# Altium PCB V3.2_Board.PcbDoc (part 1 of 9)
Units mil, origin at the board's own origin, x right, y up, seen from the top; angles counter-clockwise.
Board outline 7795.28 x 4881.89 mil, 2 copper layers (Top Layer, Bottom Layer), stack 57 mil thick; 419 components, 273 nets, 1244 pads, 414 vias.
Unrouted connection lines stored in the file: 3.
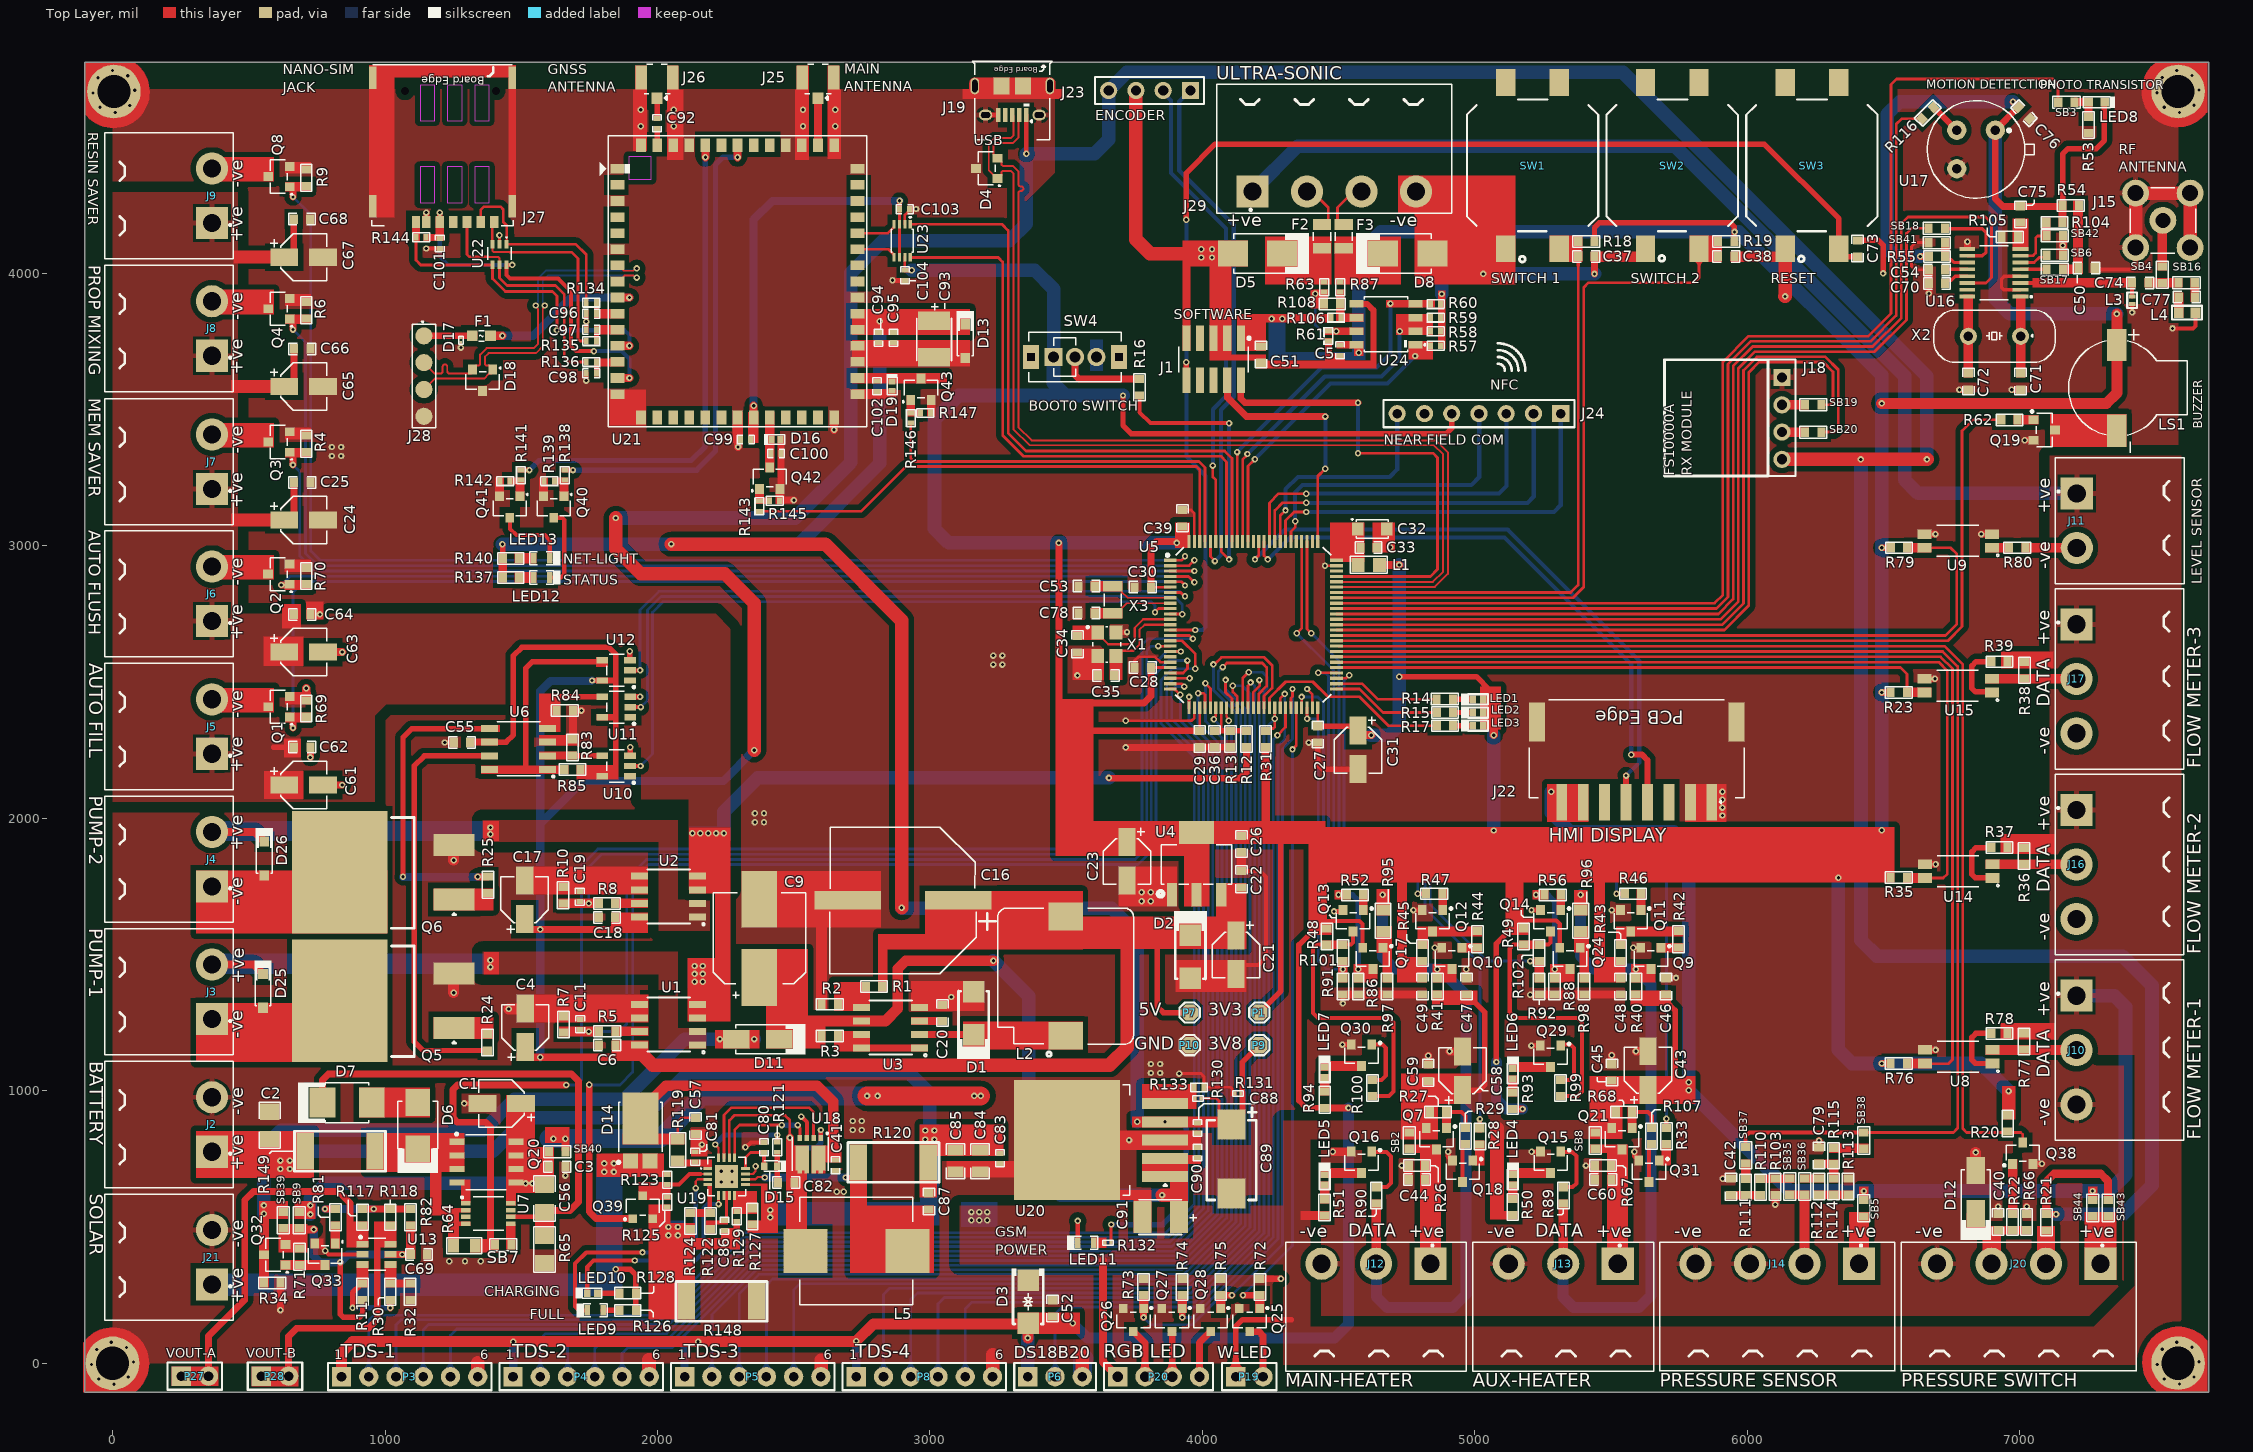
[diagram p0: Top Layer view]
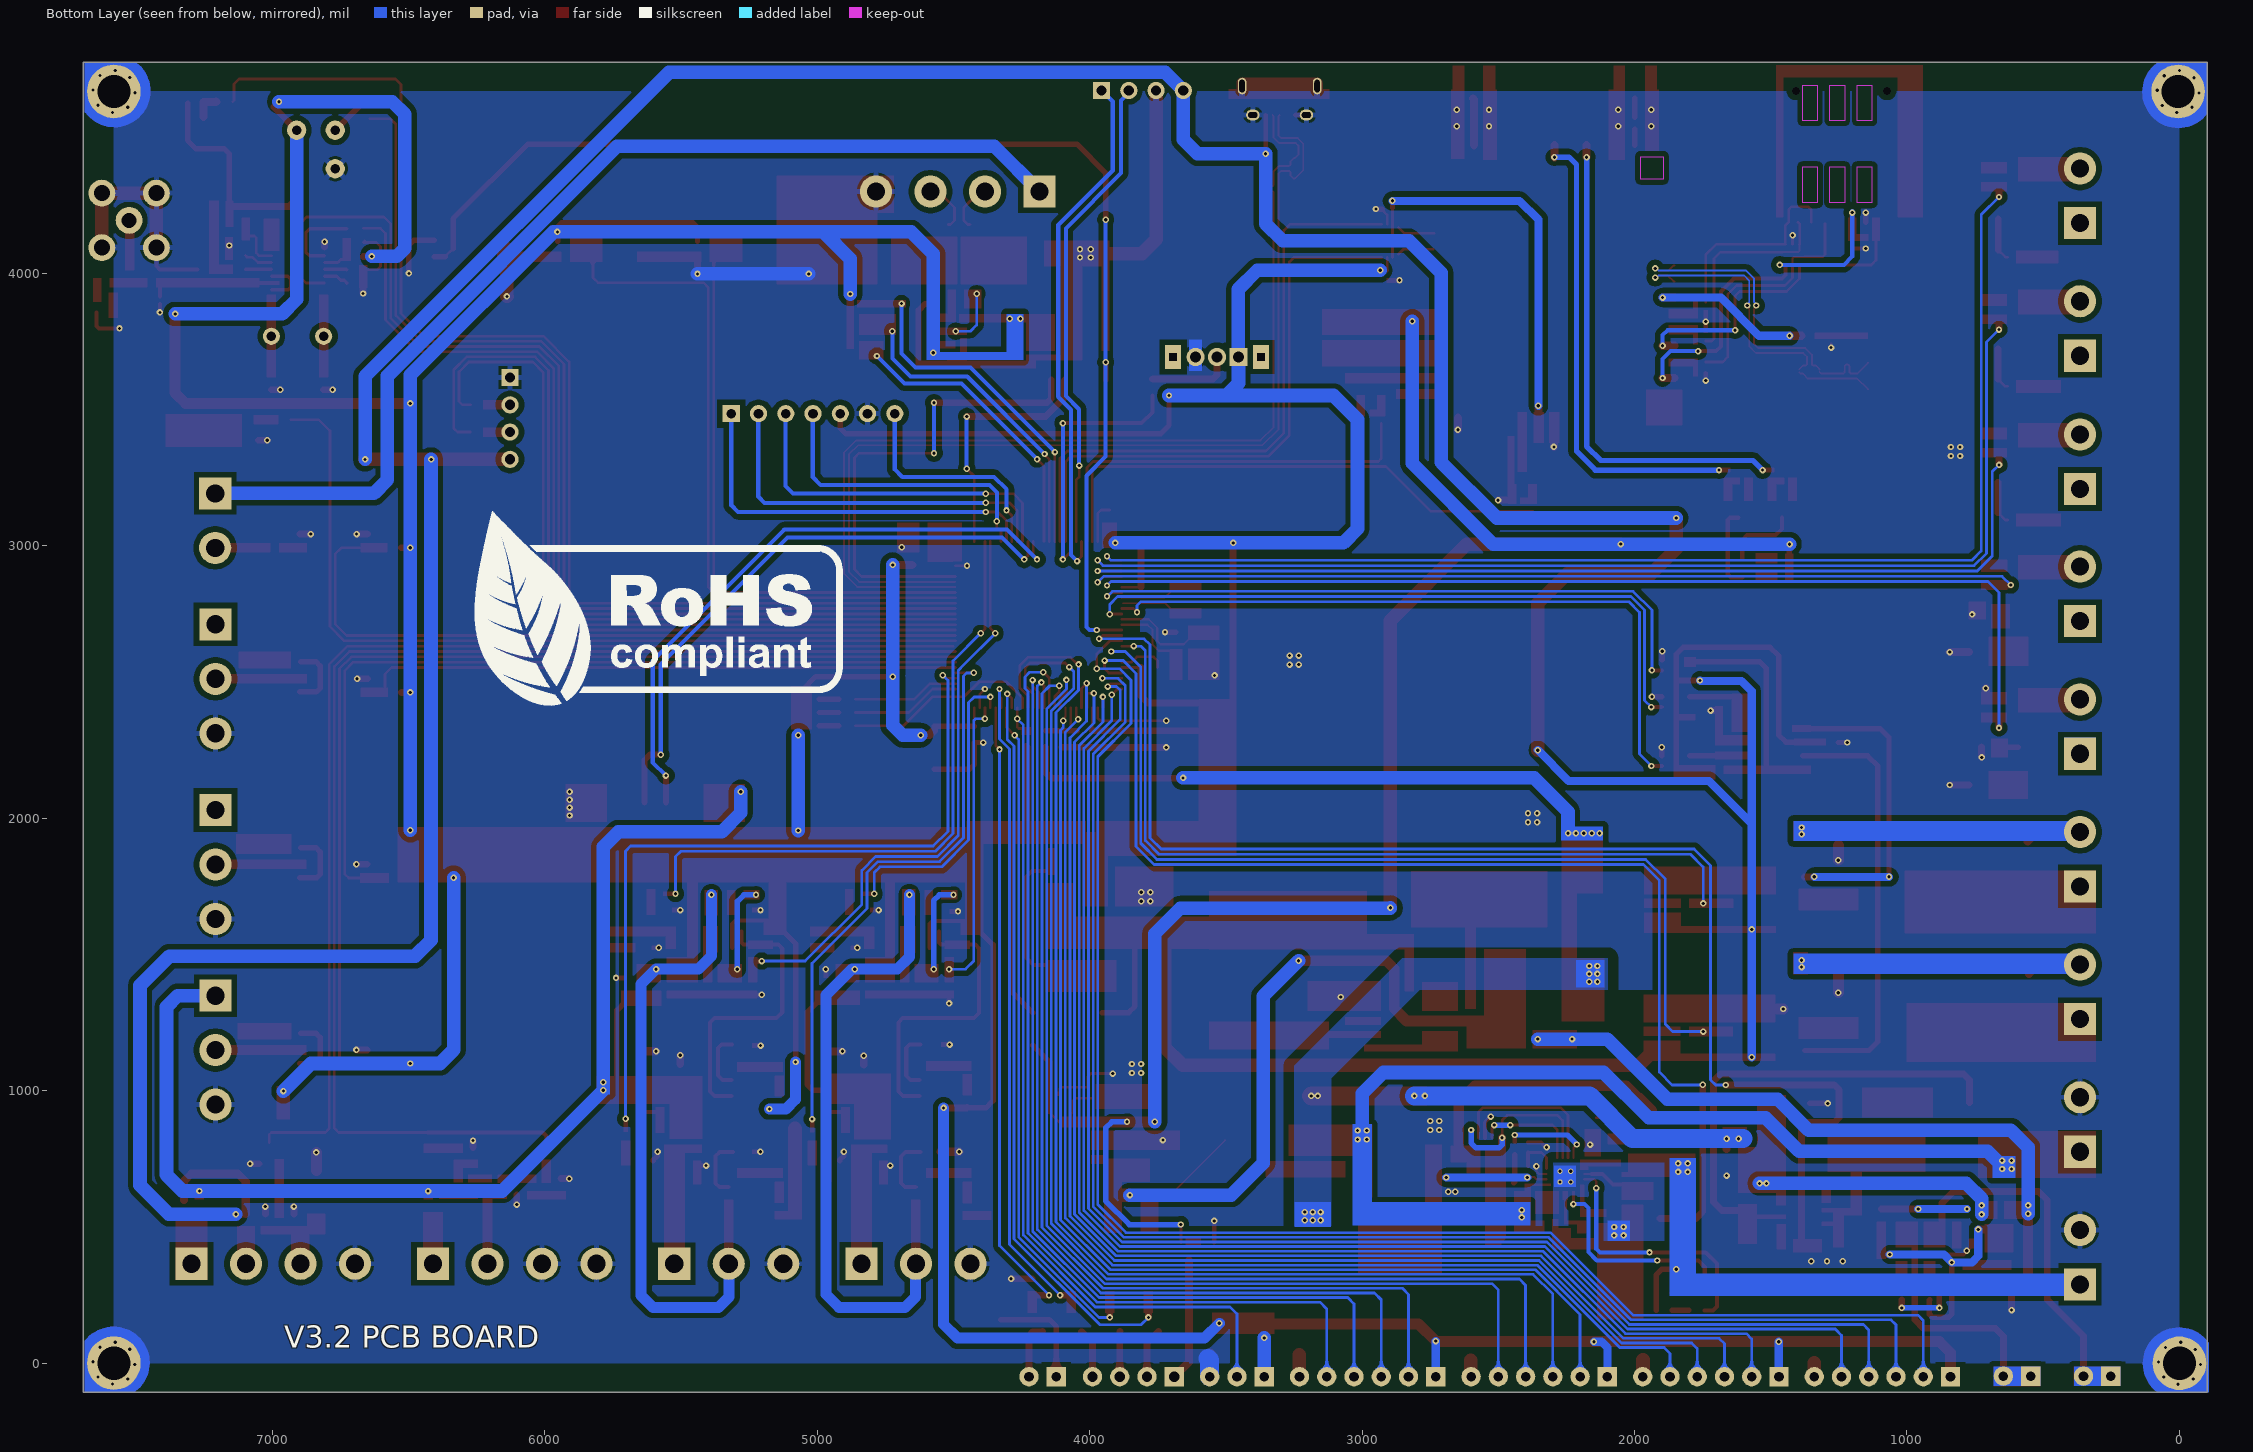
[diagram p1: Bottom Layer view, seen from below]
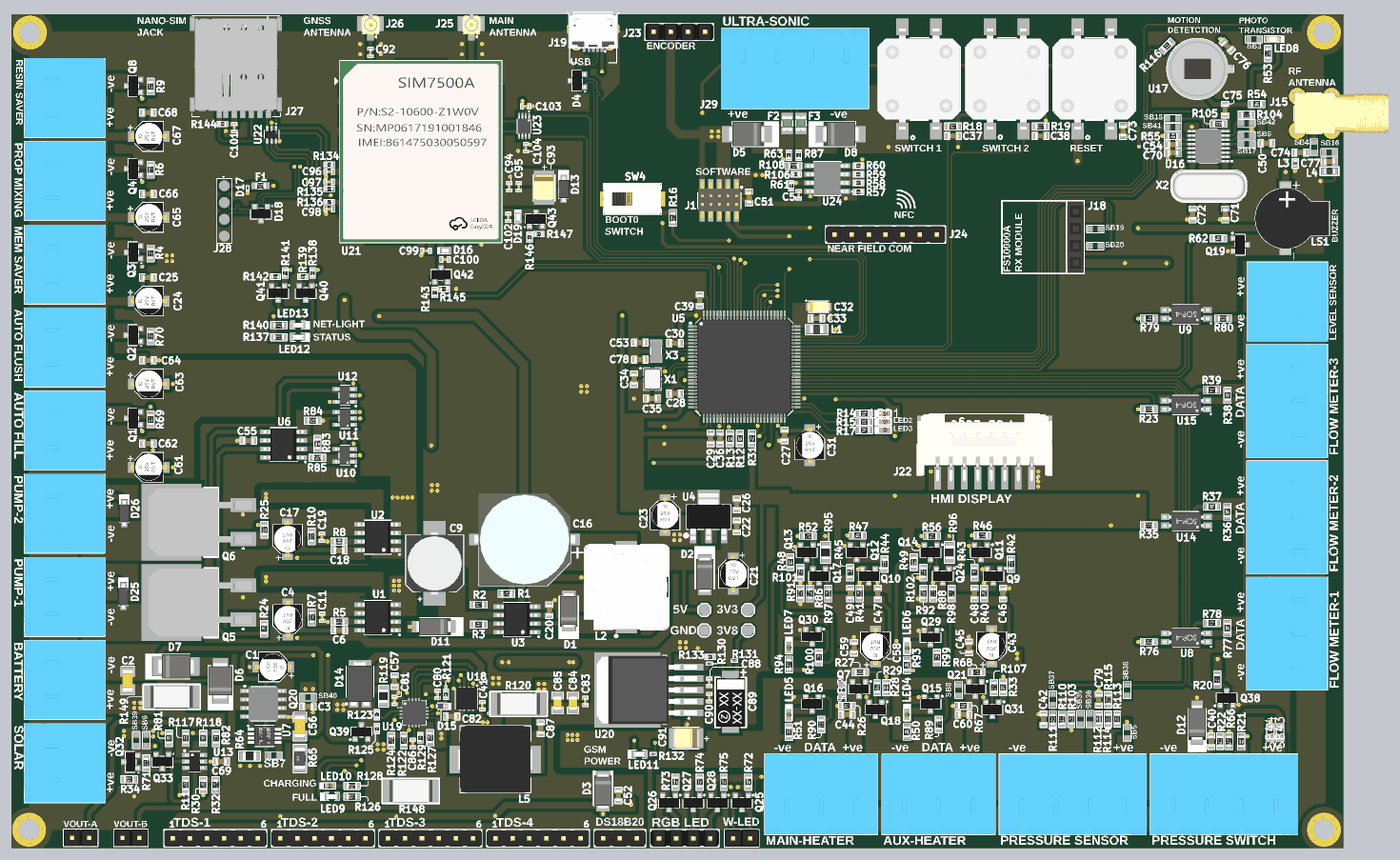
[diagram p6: 3D render of the assembled board from above, using the file's embedded part models]

## Layer stack, top to bottom
Top Solder: solder mask 3, Solder Resist, Dk 3.5
Top Layer: signal copper 10
Dielectric 1: dielectric 37, FR-4, Dk 4.8
Bottom Layer: signal copper 10
Bottom Solder: solder mask 3, Solder Resist, Dk 3.5

## Board outline
-102.2,-107.47 -102.2,4774.42 7693.08,4774.42 7693.08,-107.23 7693.08,-107.47

## Design rules (kind name [scope] priority, off if disabled: settings)
Clearance [All] p1: gap=10 ignorepadtopadclearanceinfootprint=FALSE except(7: Arc-SMDPad Track-Track Track-SMDPad SMDPad-SMDPad SMDPad-Via SMDPad-Fill; 20: Arc-Poly Track-Poly SMDPad-Poly THPad-Poly Via-Poly Fill-Poly Poly-Region; 40: Poly-Poly)
ComponentClearance [All] p1: gap=0 collisioncheckmode=3 verticalgap=0 showdistances=FALSE
DiffPairsRouting RS485 [InDifferentialPairClass('RS485_LINES')] p1: maxlimit=24 minlimit=24 mostfreqgap=24 toplayer_minwidth=10 toplayer_maxwidth=10 toplayer_prefwidth=10 bottomlayer_minwidth=10 bottomlayer_maxwidth=10 bottomlayer_prefwidth=10 impedanceprofiledriven=TRUE impedanceprofileid={96F7C619-5FC5-426D-8E7C-580E3D6EA915} impedanceprofilevalue=120.000000 maxuncoupledlength=500
DiffPairsRouting [All] p2: maxlimit=11 minlimit=11 mostfreqgap=11 toplayer_minwidth=7 toplayer_maxwidth=7 toplayer_prefwidth=7 bottomlayer_minwidth=7 bottomlayer_maxwidth=7 bottomlayer_prefwidth=7 impedanceprofiledriven=TRUE impedanceprofileid={F2DA4722-311A-4C31-A35F-DFB7A417A014} impedanceprofilevalue=90.000000 maxuncoupledlength=500
HoleSize [All] p1: absolutevalues=TRUE maxlimit=1000 minlimit=1 maxpercent=80.000 minpercent=20.000
HoleToHoleClearance [All] p1: gap=0 allowstackedmicrovias=TRUE
MatchedLengths "Schematic Matched Net Lengths" [InNetClass('RS485')] p1: tolerance=20 checknetsindiffpair=TRUE checkdiffpairvsdiffpair=FALSE checkxsignals=FALSE checkothers=FALSE
MatchedLengths "Schematic Matched Net Lengths_2" [InNetClass('USB_D')] p2: tolerance=50 checknetsindiffpair=TRUE checkdiffpairvsdiffpair=FALSE checkxsignals=FALSE checkothers=FALSE
MatchedLengths "Schematic Matched Net Lengths_1" [InNetClass('GSM_USB')] p3: tolerance=20 checknetsindiffpair=TRUE checkdiffpairvsdiffpair=FALSE checkxsignals=FALSE checkothers=FALSE
MaxMinImpedance "Schematic Impedance Constraint" [InNetClass('RS485')] p1: minimum=115.0 maximum=120.0
MaxMinImpedance "Schematic Impedance Constraint_2" [InNetClass('USB_D')] p2: minimum=85.00 maximum=90.00
MaxMinImpedance "Schematic Impedance Constraint_1" [InNetClass('GSM_USB')] p3: minimum=88.00 maximum=90.00
MinimumSolderMaskSliver [All] p1: minsoldermaskwidth=0
PolygonConnect [All] p1: thpad.connectstyle=Relief thpad.reliefconductorwidth=20 thpad.reliefentries=4 thpad.polygonreliefangle="90 Angle" thpad.airgapwidth=10 smdpad.connectstyle=Direct smdpad.reliefconductorwidth=20 smdpad.reliefentries=4 smdpad.polygonreliefangle="90 Angle" smdpad.airgapwidth=10 via.connectstyle=Direct via.reliefconductorwidth=10 via.reliefentries=4 via.polygonreliefangle="90 Angle" via.airgapwidth=10
RoutingVias [All] p1: holewidth=11.81 width=23.62 viastyle="Through Hole" minholewidth=11.81 minwidth=23.62 maxholewidth=31.5 maxwidth=62.99
SilkToSilkClearance [All] p1: silktosilkclearance=0
SilkToSolderMaskClearance [IsPad] p1: minsilkscreentomaskgap=0 clearancetoexposedcopper=TRUE
SolderMaskExpansion SolderMaskExpansion_1 [IsVia] p1: expansion=0 istentingtop=FALSE soldermaskfromhole=TRUE
SolderMaskExpansion [Not IsVia] p2: expansion=4 istentingtop=FALSE
Width [All] p1: maxlimit=70 minlimit=7 preferedwidth=10 minimp=50.000000 maximp=50.000000 favimp=50.000000
23 further rules are at their usual default settings.

## Classes and differential pairs
differential pair class RS485_LINES: RS485
net class RS485: RS485_N RS485_P
component class U_Ultra_Sonic_Section: C5 D5 D8 F2 F3 J29 R57 R58 R59 R60 R61 R63 R87 R106 R108 U24
component class U_HMI_Encoder_NFC_Sheet: J22 J23 J24
differential pair class GSM_USB_Lines: GSM_USB_D
net class GSM_USB: GSM_USB_D_N GSM_USB_D_P
component class U_Solar_Charge_Controller: C41 C57 C80 C81 C82 C83 C84 C85 C86 C87 D14 D15 J21 L5 LED9 LED10 Q39 R119 R120 R121 R122 R123 R124 R125 R126 R127 R128 R129 R148 U18 U19
component class U_GSM_Sheet: C92 C93 C94 C95 C96 C97 C98 C99 C100 C101 C102 C103 C104 D13 D16 D17 D18 D19 F1 J25 J26 J27 J28 LED12 LED13 Q40 Q41 Q42 Q43 R134 R135 R136 R137 R138 R139 R140 R141 R142 R143 R144 R145 R146 R147 U21 U22 U23
differential pair class USB_D_Lines: USB_D
net class USB_D: USB_D_N USB_D_P
component class U_Voltage_Monitoring_Section: C69 P27 P28 Q32 Q33 R11 R30 R32 R34 R71 R81 R82 R117 R118 S SB9 SB39 U13
component class U_Temperature_Sense_Section: C52 D3 P3 P4 P5 P6 P8
component class U_Valve_Section: C24 C25 C61 C62 C63 C64 C65 C66 C67 C68 J5 J6 J7 J8 J9 Q1 Q2 Q3 Q4 Q8 R4 R6 R9 R69 R70 S
component class U_Sensor_Section: J10 J11 J16 J17 R23 R35 R36 R37 R38 R39 R76 R77 R78 R79 R80 U8 U9 U14 U15
component class U_LED_Section: P19 P20 Q25 Q26 Q27 Q28 R72 R73 R74 R75 S
component class U_Heater_Section: C43 C44 C45 C46 C47 C48 C49 C58 C59 C60 J12 J13 LED4 LED5 LED6 LED7 Q7 Q9 Q10 Q11 Q12 Q13 Q14 Q15 Q16 Q17 Q18 Q21 Q24 Q29 Q30 Q31 R26 R27 R28 R29 R33 R40 R41 R42 R43 R44 R45 R46 R47 R48 R49 R50 R51 R52 R56 R67 R68 R86 R88 R89 R90 R91 R92 R93 R94 R95 R96 R97 R98 R99 R100 R101 R102 R107 S SB2 SB8
component class U_Switch_Sheet: C37 C38 R18 R19 SW1 SW2
component class U_Regulator_Section: C9 C16 C20 C21 C22 C23 C26 C88 C89 C90 C91 D1 D2 D11 L2 LED11 P1 P7 P9 P10 R1 R2 R3 R130 R131 R132 R133 U3 U4 U20
component class U_Receiver_Section: C50 C54 C70 C71 C72 C74 C75 C77 J15 J18 L3 L4 R54 R55 R104 R105 S SB4 SB6 SB16 SB17 SB18 SB19 SB20 SB41 SB42 U16 X2
component class U_Gate_Driver_Section: C55 D25 D26 J3 J4 Q5 Q6 R24 R25 R83 R84 R85 U6 U10 U11 U12
component class U_Current_Sense_Section: C4 C6 C11 C17 C18 C19 R5 R7 R8 R10 U1 U2
component class U_Controller_Section: C27 C28 C29 C30 C31 C32 C33 C34 C35 C36 C53 C73 C78 L1 LED1 LED2 LED3 R12 R13 R14 R15 R16 R17 R31 S SW3 SW4 U5 X1 X3
component class U_Connector_Section: C39 C40 C42 C51 C76 C79 D4 D12 J1 J14 J19 J20 LED8 LS1 Q19 Q38 R20 R21 R22 R53 R62 R66 R103 R110 R111 R112 R113 R114 R115 R116 S SB3 SB5 SB35 SB36 SB37 SB38 SB43 SB44 U17
component class "U_Reverse Protection_Section": C1 C2 C3 C56 D6 D7 J2 Q20 R64 R65 R149 SB7 SB40 U7
differential pair RS485: +RS485_P -RS485_N
differential pair GSM_USB_D: +GSM_USB_D_P -GSM_USB_D_N
differential pair USB_D: +USB_D_P -USB_D_N

## Components (designator, comment, footprint, x,y, rotation, side; value= is the part's Value field where it differs from the comment)
C1 "10uF" RVT1E100M0405. 1428.24,953.36 r180 top locked
C2 "0.1uF" Cap-1206 577,873 r270 top locked
C3 "1uF" Cap0603 1632,721 r0 top
C4 "10uF" RVT1E100M0405. 1514.64,1231.47 r90 top
C5 "0.1uf" Cap-0402 4505.16,3717.52 r90 top
C6 "0.1uF" Cap0603 1815.64,1167.25 r180 top
C9 "100uF" UWX1E101MCL1GB 2374.02,1559.16 r90 top locked
C11 "1nF" Cap-0402 1716.42,1243.47 r90 top
C16 "470uF" VT1H471MI135000CE0 2901.11,1699.36 r180 top locked
C17 "10uF" RVT1E100M0405. 1512.68,1700.47 r90 top
C18 "0.1uF" Cap0603 1814.64,1636.25 r180 top
C19 "1nF" Cap-0402 1714.42,1712.47 r90 top
C20 "470pF" Cap0603 3046,1285 r270 top locked
C21 "10uF" RVT1E100M0405. 4123.35,1499.17 r270 top
C22 "0.1uF" Cap0603 4143.11,1776.36 r90 top
C23 "10uF" RVT1E100M0405. 3723.25,1842.39 r270 top locked
C24 "10uF" RVT1E100M0405. 701,3095.04 r0 top locked
C25 "0.1uF" Cap0603 696,3233 r0 top locked
C26 "0.1uF" Cap0603 4143.11,1905.39 r270 top
C27 "0.1uF" Cap0603 4423.2,2307.85 r270 top
C28 "0.1uF" Cap0603 3781,2553.04 r180 top
C29 "0.1uF" Cap0603 3990.13,2290.85 r270 top
C30 "0.1uF" Cap0603 3781,2848.32 r180 top
C31 "10uF" RVT1E100M0405. 4571,2251 r270 top
C32 "1uF" "CAP-CASE A" 4623,3062 r0 top
C33 "0.1uF" Cap0603 4610,2993.56 r0 top
C34 "30pF" Cap0603 3541.11,2638.36 r90 top
C35 "30pF" Cap0603 3646.11,2524.36 r0 top
C36 "0.1uF" Cap0603 4045.11,2290.85 r270 top
C37 "0.1uF" Cap0603 5409.05,4062.36 r180 top locked
C38 "0.1uF" Cap0603 5922.41,4062.36 r180 top locked
C39 "0.1uF" Cap0603 3926.31,3101 r90 top
C40 "1uF" Cap0603 6920.13,518 r90 top
C41 "1uF" Cap0402 2653.6,726.22 r90 top
C42 "1uF" Cap-0603 5940,647.36 r90 top locked
C43 "10uF" RVT1E100M0405. 5635.5,1074 r90 top locked
C44 "0.1uF" Cap0603 4787.3,673.58 r0 top
C45 "1uF" Cap0603 5503,1067 r90 top locked
C46 "0.1uF" Cap0603 5701.4,1383 r90 top locked
C47 "0.1uF" Cap0603 4969.25,1383 r90 top locked
C48 "0.1uF" Cap0603 5535,1383 r270 top locked
C49 "0.1uF" Cap0603 4807,1383 r270 top locked
C50 "0.1uF" Cap-0603 7245,4019.56 r0 top
C51 "0.1uF" Cap0603 4215.05,3701.89 r270 top
C52 "0.1uF" Cap0603 3450,201 r90 top locked
C53 "20pF" Cap0603 3575,2851.85 r0 top
C54 "0.1uF" Cap-0603 6696,4012.67 r180 top locked
C55 "0.1uF" Cap0603 1283,2278 r180 top
C56 "0.047uF" Cap-1206 1585.11,604.36 r90 top locked
C57 "10uF" Cap0603 2139.88,870.64 r90 top
C58 "10uF" RVT1E100M0405. 4955,1073 r90 top locked
C59 "1uF" Cap0603 4828.77,1066 r90 top locked
C60 "0.1uF" Cap0603 5471,673.58 r0 top locked
C61 "10uF" RVT1E100M0405. 701,2122.04 r0 top locked
C62 "0.1uF" Cap0603 696,2261 r0 top locked
C63 "10uF" RVT1E100M0405. 701,2610 r0 top locked
C64 "0.1uF" Cap0603 696,2748 r0 top locked
C65 "10uF" RVT1E100M0405. 701,3585.04 r0 top locked
C66 "0.1uF" Cap0603 696,3722.36 r0 top locked
C67 "10uF" RVT1E100M0405. 701,4059.15 r0 top locked
C68 "0.1uF" Cap0603 695,4199 r0 top locked
C69 "0.1uF" Cap0603 1124.27,399.43 r0 top locked
C70 "0.47uF" Cap0603 6696,3963 r180 top locked
C71 "20pF" Cap-0603 7003.06,3603 r90 top
C72 "20pF" Cap-0603 6811.06,3603 r90 top locked
C73 "0.1uF" Cap0603 6405,4091 r270 top locked
C74 "1.2pF" Cap0603 7442,3965 r0 top locked
C75 "2.2uF" Cap0603 7002,4216 r90 top
C76 "0.1uF" Cap0603 7015.31,4588.34 r315 top locked
C77 "1.5pF" Cap0603 7613,3912.65 r0 top locked
C78 "20pF" Cap0603 3575,2752.85 r0 top
C79 "1uF" Cap-0603 6263,762 r270 top locked
C80 "1uF" Cap0402 2391,792 r90 top locked
C81 "1uF" Cap0402 2138.88,757.64 r270 top
C82 "0.1uF" Cap0603 2472.88,662.64 r0 top locked
C83 "1uF" Cap0402 3256.88,751.64 r90 top locked
C84 "22uF" Cap-0805 3184.38,741.64 r90 top locked
C85 "22uF" Cap-0805 3093.88,741.64 r90 top locked
C86 "1uF" Cap0402 2245.76,505.14 r90 top locked
C87 "0.1uF" Cap0603 2996,594 r90 top locked
C88 "0.1uf" Cap-0402 3981.86,863.37 r90 top
C89 "330uF" Case-E 4106.86,876.12 r270 top locked
C90 "0.1uf" Cap-0402 3981.86,773.12 r270 top
C91 "100uF" Case-B 3846.86,536.12 r180 top locked
C92 "33pF" Cap-0402 1998.65,4550.36 r90 top
C93 "220uF" Case-B 3015,3759 r270 top
C94 "0.1uf" Cap-0402 2811.11,3764.09 r90 top
C95 "1uF" Cap-0402 2866.11,3764.09 r90 top
C96 "22PF" Cap-0402 1757.11,3852.02 r0 top value=22pF
C97 "22PF" Cap-0402 1757.11,3792.97 r0 top value=22pF
C98 "22PF" Cap-0402 1757.11,3633.52 r0 top value=22pF
C99 "0.1uf" Cap-0402 2323.61,3390.36 r180 top
C100 "0.1uf" Cap-0402 2435.11,3338.36 r180 top
C101 "0.1uf" Cap-0402 1201.06,4109.58 r270 top
C102 "0.1uf" Cap-0402 2806.11,3585.36 r90 top
C103 "0.1uf" Cap-0402 2906.95,4234.86 r0 top
C104 "0.1uf" Cap-0402 2907.95,3992.85 r270 top
D1 "SS24A" SMA#1 3160,1284 r90 top locked
D2 "1SMA5930BT3G" SMA#1 3956,1492 r270 top
D3 "SMAJ5.0CA" SMAJ5.0CA 3360.11,225.36 r270 top locked
D4 "ESD5302F-3/TR" Sot-23 3209.02,4385.2 r90 top
D5 "SMBJ26CA" SMB_ 4202,4072.52 r0 top
D6 "SMBJ70A/TR13" SMB 1120,872 r90 top locked
D7 "SS510B" SS510B 861,956 r0 top locked
D8 "SMBJ26CA" SMB_ 4753.05,4072.52 r180 top
D11 "SS32 /SMA(DO-214AC)" SMA#2 2368.11,1189.36 r180 top
D12 "SMAJ5.0CA" SMA#2 6838,628 r90 top
D13 "MMSZ5231BT1G" SOD-123 3129.67,3751.09 r90 top
D14 "PDS1040-13" "PowerDI™ 5" 1937.1,820.02 r0 top locked
D15 "ZLLS350TA" SOD-523 2415.88,723.32 r0 top locked value=3.5pF
D16 "ESD5651N-2/TR" DFN1006-2L_ 2435.11,3390.36 r0 top
D17 "PESD5V0H1BSFYL" DSN0603-2 1278.73,3754.85 r90 top
D18 "ESD5302F-3/TR" Sot-23 1358,3607 r180 top
D19 "ESD5651N-2/TR" DFN1006-2L_ 2861.11,3585.81 r270 top
D25 "1N4148W-7-F" SOD-123 552.11,1366.36 r90 top locked value=2pF
D26 "1N4148W-7-F" SOD-123 557.11,1852.36 r90 top locked value=2pF
F1 "SMD0603-050" Fuse-0603 1353.73,3770.58 r180 top
F2 "SMD0805P020TF" Fuse-0805 4439.06,4135.51 r90 top
F3 "SMD0805P020TF" Fuse-0805 4518.67,4135.51 r90 top
J1 "20021121-00010C4LF" 20021121-00010C4LF_ 4041,3684.77 r180 top
J2 "TBP01R1-508-02BE" TBP01R1-508-02BE 365.05,876.09 r90 top
J3 "TBP01R1-508-02BE" TBP01R1-508-02BE 365.05,1362.98 r90 top
J4 "TBP01R1-508-02BE" TBP01R1-508-02BE 365.05,1850.03 r90 top
J5 "TBP01R1-508-02BE" TBP01R1-508-02BE 365.05,2336.53 r90 top
J6 "TBP01R1-508-02BE" TBP01R1-508-02BE 365.05,2823.53 r90 top
J7 "TBP01R1-508-02BE" TBP01R1-508-02BE 365.05,3308.53 r90 top
J8 "TBP01R1-508-02BE" TBP01R1-508-02BE 365.05,3797.53 r90 top
J9 "TBP01R1-508-02BE" TBP01R1-508-02BE 365.05,4284.53 r90 top
J10 "TBP01R1-508-03BE" TBP01R1-508-03BE 7208.11,1249.03 r270 top
J11 "TBP01R1-508-02BE" TBP01R1-508-02BE 7209.11,3092.36 r270 top
J12 "TBP01R1-508-03BE" TBP01R1-508-03BE 4737.28,365 r180 top
J13 "TBP01R1-508-03BE" TBP01R1-508-03BE 5424.28,365 r180 top
J14 "TBP01R1-508-04BE" TBP01R1-508-04BE 6210.11,365 r180 top
J15 "HJ-SMA508" HJ-SMA508 7525.11,4194.36 r270 top locked
J16 "TBP01R1-508-03BE" TBP01R1-508-03BE 7208.11,1930.36 r270 top
J17 "TBP01R1-508-03BE" TBP01R1-508-03BE 7208.11,2611.7 r270 top
J18 "C2718488" "HDR1X4 Female" 6127.11,3467.36 r270 top locked
J19 "10118194-0001LF" 10118194-0001LF_ 3302.52,4581.04 r180 top
J20 "TBP01R1-508-04BE" TBP01R1-508-04BE 7095.94,365 r180 top
J21 "TBP01R1-508-02BE" TBP01R1-508-02BE 365.05,389.19 r90 top
J22 "A2008WR-S-8P" A2008WR-S-8P 5574.46,2205.64 r180 top
J23 "B-2100S04P-A110" HDR1X4_ 3956,4671 r180 top
J24 "PZ254V-11-07P" HDR1X7 5315,3485 r180 top
J25 "U.FL-R-SMT-1(80)" U.FL-R-SMT-1(80)_ 2589.11,4680.36 r0 top
J26 "U.FL-R-SMT-1(80)" U.FL-R-SMT-1(80)_ 1998.65,4680.36 r0 top
J27 "XKNANO-113" XKNANO-113 1210.91,4453.22 r180 top
J28 "POGO Connector 4 Pin" "Pogo 4 Pin" 1142.73,3622.94 r270 top
J29 "TBP01R1-508-04BE" TBP01R1-508-04BE 4384,4300 r0 top
L1 "10uH" Ind0805 4611,2929.74 r180 top
L2 "220uH" SLF12575T-221M1R3-PF 3498.11,1420.36 r90 top locked
L3 "39nH" "IND 0402" 7412.44,3901.26 r270 top locked
L4 "33nH" "IND 0603" 7613.59,3856 r0 top locked
L5 "3.3uH" YSPI1040-3R3M 2730,412 r0 top
LED1 "XZMDK68W-2" "LED 0402" 5011.5,2436.13 r180 top
LED2 "XZMDK68W-2" "LED 0402" 5011.5,2388.06 r180 top
LED3 "XZMDK68W-2" "LED 0402" 5011.5,2340 r180 top
LED4 "XZMDK68W-2" "LED 0402" 5139.56,673.89 r90 top locked
LED5 "XZMDK68W-2" "LED 0402" 4448.36,672.89 r90 top locked
LED6 "XZMDK68W-2" "LED 0402" 5139,1063.04 r90 top locked
LED7 "XZMDK68W-2" "LED 0402" 4448.36,1067.04 r90 top locked
LED8 "ALS-PT19-315C/L177/TR8" ALS-PT19-315C/L177/TR 7282.11,4628.36 r180 top locked
LED9 "RED" LED-0603 1772,194 r180 top locked
LED10 "Green" LED-0402 1761,257 r180 top locked
LED11 "RED" LED-0603 3572,442 r180 top locked
LED12 "Yellow" LED-0603 1575,2883.57 r0 top
LED13 "RED" LED-0603 1575,2954 r0 top
LS1 "YS-SBZ9032C03R16" YS-SBZ9032C03R16 7356,3579.48 r270 top
P1 "Test Point" "TEST POINT"#1 4209,1167.13 r0 top locked
P3 "61300611121" HDR1X6 840.25,-49.47 r0 top locked
P4 "61300611121" HDR1X6 1470,-49.47 r0 top locked
P5 "61300611121" HDR1X6 2099.75,-49.47 r0 top locked
P6 "61300311121" HDR1X3 3359.25,-49.47 r0 top locked
P7 "Test Point" "TEST POINT"#2 3953,1287 r0 top locked
P8 "61300611121" HDR1X6 2729.5,-49.47 r0 top locked
P9 "Test Point" "TEST POINT"#3 4209,1287 r0 top locked
P10 "Test Point" "TEST POINT"#2 3953,1167.13 r0 top locked
P19 "61300211121" HDR1X2 4122.25,-49.47 r0 top
P20 "61300411121" HDR1X4 3689.25,-49.47 r0 top locked
P27 "61300211121" HDR1X2 252.25,-47.47 r0 top
P28 "61300211121" HDR1X2 546.25,-47.47 r0 top locked
Q1 "WNM2016A-3/TR" sot-23 611,2409 r90 top
Q2 "WNM2016A-3/TR" sot-23 610,2896 r90 top
Q3 "WNM2016A-3/TR" sot-23 611,3381 r90 top
Q4 "WNM2016A-3/TR" sot-23 611,3870 r90 top
Q5 "IRF3205STRLPBF" D2Pak. 1043.62,1330.52 r90 top locked
Q6 "IRF3205STRLPBF" D2Pak. 1043.62,1801.53 r90 top locked
Q7 "IRLML6402TRPBF" SOT-23 4858.77,823.74 r180 top locked
Q8 "WNM2016A-3/TR" sot-23 611,4355 r90 top
Q9 "BC847B,215" SOT-23 5646,1485.52 r180 top locked
Q10 "BC847B,215" SOT-23 4915.7,1485.52 r180 top locked
Q11 "BC847B,215" SOT-23 5572,1623.76 r180 top locked
Q12 "BC847B,215" SOT-23 4844.37,1623.76 r180 top locked
Q13 "BC847B,215" SOT-23 4553,1623.76 r180 top locked
Q14 "BC847B,215" SOT-23 5277.74,1623.76 r180 top locked
Q15 "BC847B,215" SOT-23 5278,737 r180 top locked
Q16 "BC847B,215" SOT-23 4584,737 r180 top locked
Q17 "BC857C,215" SOT-23 4625.54,1485.52 r180 top locked
Q18 "MMBT5551" SOT-23 4955,704.32 r180 top locked
Q19 "MMBT5551" SOT-23 7090,3425 r270 top
Q20 "RU6085H" RU6085H 1371.75,737.74 r0 top locked
Q21 "IRLML6402TRPBF" SOT-23 5540,823.74 r180 top locked
Q24 "BC857C,215" SOT-23 5349,1485.52 r180 top locked
Q25 "DMN13H750S-7" SOT23-3 4173.23,158.53 r180 top
Q26 "DMN13H750S-7" SOT23-3 3746.82,158.53 r180 top locked
Q27 "DMN13H750S-7" SOT23-3 3888.32,158.53 r180 top locked
Q28 "DMN13H750S-7" SOT23-3 4029.82,158.53 r180 top locked
Q29 "BC847B,215" SOT-23 5277.6,1126.63 r180 top locked
Q30 "BC847B,215" SOT-23 4584,1130.22 r180 top locked
Q31 "MMBT5551" SOT-23 5639,704.32 r180 top locked
Q32 "AO3407" SOT-23 594.9,397.83 r90 top locked
Q33 "MMBT2222A-7-F" SOT-23 779.77,399.6 r180 top locked
Q38 "MMBT5551" SOT-23 7011,771 r0 top locked
Q39 "2N7002-7-F" SOT23-3 1945.96,572.26 r0 top locked
Q40 "MMBT2222A-7-F" SOT-23 1619.11,3142.36 r180 top
Q41 "MMBT2222A-7-F" SOT-23 1458.11,3142.36 r180 top
Q42 "MMBT2222A-7-F" SOT-23 2412.11,3248.36 r0 top
Q43 "MMBT2222A-7-F" SOT-23 2967.06,3574.86 r0 top
R1 "3.6K" RES-0603 2795,1382 r180 top locked
R2 "1.2k" RES-0603 2632.11,1317.36 r0 top locked
R3 "0.33R" RES-0603 2632.11,1200.9 r180 top locked value=0.33Ω
R4 "10K" RES-0603 711,3374.52 r90 top locked
R5 "4.7K" RES-0603 1815.64,1218.25 r180 top
R6 "10K" RES-0603 711,3864.52 r90 top locked
R7 "6.8K" RES-0603 1655.42,1243.47 r90 top value=6.8kR
R8 "4.7K" RES-0603 1814.64,1687.25 r180 top
R9 "10K" RES-0603 711,4350.98 r90 top locked
R10 "6.8K" RES-0603 1653.42,1717.47 r90 top value=6.8kR
R11 "2.21M" RES-0603 916.95,262.43 r270 top locked
R12 "10K" RES-0603 4161.39,2290.85 r90 top
R13 "2.7K" RES-0603 4102.33,2290.85 r90 top
R14 "680R" RES-0603 4889.49,2437 r0 top
R15 "680R" RES-0603 4889.99,2388.23 r0 top
R16 "2.2K" RES-0603 3769,3582 r270 top
R17 "680R" RES-0603 4889.99,2339.47 r0 top
R18 "2.2K" RES-0603 5409.05,4117.27 r0 top locked
R19 "2.2K" RES-0603 5922.41,4117.27 r0 top locked
R20 "10K" RES-0603 6955.78,880 r90 top
R21 "10K" RES-0603 7097.11,517.36 r90 top
R22 "2.2K" RES-0603 6973.28,518 r270 top
R23 "3.3K" RES-0603 6555.57,2461.72 r180 top locked
R24 "47R" RES-0603 1376,1177 r270 top
R25 "47R" RES-0603 1378,1756 r90 top
R26 "1K" RES-0603 4787.3,725.58 r180 top
R27 "10K" RES-0603 4864.77,922 r180 top locked
R28 "4.7K" Res-0603 5018.54,832.27 r270 top locked
R29 "1K" Res-0603 4965,833.27 r270 top locked
R30 "20K" RES-0603 1019.27,262.43 r270 top locked
R31 "4.7K" RES-0603 4232.25,2290.85 r270 top
R32 "63.4K" RES-0603 1092.27,262.43 r270 top locked
R33 "4.7K" RES-0603 5703,833.27 r270 top locked
R34 "1K" RES-0603 586,295 r0 top locked
R35 "3.3K" RES-0603 6555.57,1781.89 r180 top
R36 "3.3K" RES-0603 7015.36,1861 r90 top
R37 "2.2K" RES-0603 6924.97,1893 r0 top
R38 "3.3K" Res-0603 7016.57,2543.45 r90 top
R39 "2.2K" RES-0603 6925.18,2574.45 r0 top
R40 "1K" RES-0603 5591,1383 r270 top locked
R41 "1K" RES-0603 4862.16,1383 r270 top locked
R42 "4.7K" RES-0603 5748,1556 r90 top locked
R43 "4.7K" RES-0603 5535,1506 r270 top locked
R44 "4.7K" RES-0603 5009,1556 r90 top locked
R45 "4.7K" RES-0603 4806.97,1506 r270 top locked
R46 "4.7K" RES-0603 5580,1723 r180 top locked
R47 "4.7K" RES-0603 4851,1723 r180 top locked
R48 "4.7K" RES-0603 4457,1566 r90 top locked
R49 "4.7K" RES-0603 5179,1566.28 r90 top locked
R50 "1K" RES-0603 5139,572.89 r270 top
R51 "1K" RES-0603 4448.36,571.89 r270 top
R52 "4.7K" RES-0603 4560,1719 r180 top locked
R53 "4.7K" Res-0603 7252.52,4544.5 r90 top
R54 "0R" RES-0603 7187,4249 r180 top
R55 "10K" RES-0603 6696,4062 r180 top locked
R56 "4.7K" RES-0603 5286,1719 r180 top locked
R57 "4.7K" Res-0402 4856,3734 r0 top
R58 "4.7K" Res-0402 4856,3787.48 r0 top
R59 "4.7K" Res-0402 4856,3837.48 r0 top
R60 "4.7K" Res-0402 4856,3887.48 r0 top
R61 "4.7K" Res-0402 4462.66,3770 r270 top
R62 "4.7K" RES-0603 6961.61,3462.4 r180 top locked
R63 "22R" Res-0402 4447.3,3949.5 r90 top
R64 "100K" RES-0805 1291.11,431.36 r0 top locked
R65 "1K" Res-1206 1585.11,417.36 r90 top locked
R66 "10K" RES-0603 7025.13,518 r270 top
R67 "1K" RES-0603 5470,725.58 r180 top
R68 "10K" RES-0603 5547,922 r180 top locked
R69 "10K" RES-0603 711,2402.52 r90 top locked
R70 "10K" RES-0603 711,2889.52 r90 top locked
R71 "1K" RES-0603 686.27,390.43 r270 top locked
R72 "10K" RES-0603 4210.64,280 r90 top
R73 "10K" RES-0603 3784.23,280 r90 top locked
R74 "10K" RES-0603 3925.73,280 r90 top locked
R75 "10K" RES-0603 4067.23,280 r90 top locked
R76 "3.3K" RES-0603 6555.57,1099.89 r180 top locked
R77 "3.3K" RES-0603 7015.36,1180.79 r90 top
R78 "2.2K" RES-0603 6924.97,1210.79 r0 top
R79 "3.3K" RES-0603 6556.36,2992.89 r180 top locked
R80 "2.2K" RES-0603 6990.36,2992.89 r0 top
R81 "470R" RES-0603 818.18,535.93 r270 top
R82 "10K" RES-0603 1094.27,535.93 r90 top locked
R83 "200K" RES-0603 1687.93,2259.86 r90 top
R84 "200K" RES-0603 1660,2395 r0 top
R85 "1K" RES-0603 1687.93,2178.17 r0 top
R86 "4.7K" RES-0603 4572,1383 r90 top locked
R87 "22R" Res-0402 4505.67,3949.5 r90 top
R88 "4.7K" RES-0603 5293,1383 r90 top locked
R89 "100K" RES-0603 5325,616 r90 top
R90 "100K" RES-0603 4638,616 r90 top
R91 "1M" RES-0603 4515.6,1383 r90 top locked
R92 "1M" RES-0603 5236,1383 r90 top
R93 "330R" RES-0603 5139,963 r270 top locked
R94 "330R" RES-0603 4448.92,967 r270 top locked
R95 "50K" "RES 0805" 4663,1623.76 r90 top locked
R96 "50K" "RES 0805" 5388,1623.76 r90 top locked
R97 "150K" RES-0603 4677.94,1383 r270 top locked
R98 "150K" RES-0603 5401,1383 r270 top locked
R99 "100K" RES-0603 5315,1010 r90 top locked
R100 "100K" RES-0603 4624,1010 r90 top locked
R101 "10K" RES-0603 4515.6,1506 r90 top locked
R102 "10K" RES-0603 5236,1506 r90 top locked
R103 "150R" RES-0603 6102.16,647.36 r270 top locked
R104 "10K" RES-0603 7127.21,4187 r0 top locked
R105 "100K" RES-0603 6963,4133.33 r0 top
R106 "4.7K" Res-0402 4490.16,3837.48 r0 top
R107 "1K" Res-0603 5649,833.27 r270 top locked
R108 "120R" Res-0603 4476.16,3887.48 r0 top
R110 "10K" Res-0603 6047.83,646.36 r270 top locked
R111 "2.2K" Res-0603 5993.87,646.36 r270 top
R112 "7.5K" Res-0603 6263,648.36 r270 top
R113 "3.3K" Res-0603 6370,648.36 r270 top locked
R114 "10K" Res-0603 6316.67,648.36 r270 top
R115 "2.2K" Res-0603 6316.67,761 r270 top locked
R116 "20K" Res-0603 6661.97,4588.37 r225 top locked
R117 "0R" Res-0603 916.95,535.93 r270 top locked
R118 "0R" Res-0603 1019.31,535.93 r270 top locked
R119 "10R" RES-0805 2074.88,782.64 r270 top locked
R120 "4mR" "RES 2512" 2865.88,736.64 r180 top locked
R121 "2.2R" Res-0402 2439.88,792.64 r270 top locked
R122 "5.23K" RES-0603 2193.88,521.64 r270 top
R123 "499K" Res-0402 2036,674 r90 top locked
R124 "30.1K" RES-0603 2120.88,521.64 r270 top locked
R125 "36K" Res-0402 2036,591.76 r90 top locked value=36kR
R126 "10K" Res-0603 1891,194 r0 top locked
R127 "499K" Res-0603 2347.88,538.64 r270 top locked
R128 "10K" Res-0603 1891,257 r0 top locked
R129 "86.6K" Res-0402 2290.79,538.64 r90 top locked value=86.6kR
R130 "100K" Res-0201 3983.36,972.12 r0 top locked
R131 "470R" Res-0201 4130,990.62 r0 top
R132 "470R" Res-0201 3654,442 r0 top locked
R133 "47K" Res-0402 3987.36,1012.12 r180 top locked
R134 "22R" Res-0402 1757.11,3893.36 r0 top
R135 "0R" Res-0402 1757.11,3751.63 r0 top
R136 "22R" Res-0402 1757.11,3674.86 r0 top
R137 "180R" Res-0603 1462,2883.57 r0 top
R138 "4.7K" Res-0402 1659.51,3259.36 r270 top
R139 "47K" Res-0402 1603,3238 r0 top
R140 "180R" Res-0603 1462,2954 r0 top
R141 "4.7K" Res-0402 1499.51,3259.36 r270 top
R142 "47K" Res-0402 1440.85,3237.86 r0 top
R143 "4.7K" Res-0402 2374.71,3145 r270 top
R144 "4.7K" Res-0402 1132.56,4132.36 r180 top
R145 "47K" Res-0402 2429.75,3165.5 r180 top
R146 "4.7K" Res-0402 2930.11,3468.64 r270 top
R147 "47K" Res-0402 2983.2,3487.14 r180 top
R148 "0R" RES-2512 2235,227 r0 top locked
R149 "0R" RES-2512 835,778 r180 top locked
SB2 "Solder Bridge" "Solder Bridge" 4759.8,817.27 r270 top locked
SB3 "Solder Bridge" "Solder Bridge" 7171,4628.43 r180 top
SB4 "Solder Bridge" "Solder Bridge" 7523,3995 r90 top locked
SB5 "Solder Bridge" "Solder Bridge" 6428,569 r270 top
SB6 "Solder Bridge" "Solder Bridge" 7128.21,4065.61 r0 top locked
SB7 "Solder Bridge" "Solder Bridge" 1434.11,435.36 r180 top locked
SB8 "Solder Bridge" "Solder Bridge" 5441,817.27 r270 top locked
SB9 "Solder Bridge" "Solder Bridge" 686,525 r270 top locked
SB16 "Solder Bridge" "Solder Bridge" 7612,3965 r180 top locked
SB17 "Solder Bridge" "Solder Bridge" 7128.21,4014.61 r180 top locked
SB18 "Solder Bridge" "Solder Bridge" 6695,4165 r180 top locked
SB19 "Solder Bridge" "Solder Bridge" 6242.11,3517.36 r180 top locked
SB20 "Solder Bridge" "Solder Bridge" 6242.11,3417.36 r180 top locked
SB35 "Solder Bridge" "Solder Bridge" 6155.78,648.36 r270 top locked
SB36 "Solder Bridge" "Solder Bridge" 6210.11,648.36 r270 top locked
SB37 "Solder Bridge" "Solder Bridge" 5993.87,763 r90 top locked
SB38 "Solder Bridge" "Solder Bridge" 6428,817 r90 top locked
SB39 "Solder Bridge" "Solder Bridge" 627,525 r90 top locked
SB40 "Solder Bridge" "Solder Bridge" 1632,776 r0 top
SB41 "Solder Bridge" "Solder Bridge" 6695,4113 r180 top locked
SB42 "Solder Bridge" "Solder Bridge" 7128.21,4137.22 r0 top locked
SB43 "Solder Bridge" "Solder Bridge" 7324.11,569.36 r270 top
SB44 "Solder Bridge" "Solder Bridge" 7267.11,569.36 r270 top
SW1 "Tactile Switch" TL3300CF160Q 5211.55,4395.52 r90 top locked
SW2 "Tactile Switch" TL3300CF160Q 5724.33,4395.52 r90 top locked
SW3 "Tactile Switch" TL3300CF160Q 6237.11,4395.52 r90 top locked
SW4 "SS-12D02-G040" SS-12D02-G040 3532.26,3693 r0 top
U1 "ACS723LLCTR-20AU-T" SOIC-8 2041.64,1242.25 r180 top
U2 "ACS723LLCTR-20AU-T" SOIC-8 2041.64,1712.25 r180 top
U3 "MC34063ADR" SOIC-8 2856.12,1231.27 r180 top locked
U4 "LMS8117AMP-3.3/NOPB" SOT-223 3978.41,1833.54 r0 top locked
U5 "STM32F072VBT6" LQFP-100 4186.98,2710.52 r0 top locked
U6 "NCP81071ADR2G" SOIC-8 1490.82,2254.17 r180 top
U7 "LTC4359CMS8#PBF" LTC4359CMS8#PBF 1378.99,549.46 r0 top locked
U8 "PS2801C-1-F3-A" PS2801C-1-F3-A 6775.36,1124.89 r180 top locked
U9 "PS2801C-1-F3-A" PS2801C-1-F3-A 6774.36,3017.89 r180 top locked
U10 "SN74LV1T34DBVR" SOT-23-5 1848.41,2191.81 r180 top
U11 "SN74LV1T34DBVR" SOT-23-5 1848.82,2408.17 r180 top
U12 "SN74LV1T34DBVR" SOT-23-5 1848.42,2543.03 r180 top
U13 "TPS3700DDCR" SOT-23-6 968.13,399.6 r0 top locked
U14 "PS2801C-1-F3-A" PS2801C-1-F3-A 6775.36,1805.89 r180 top locked
U15 "PS2801C-1-F3-A" PS2801C-1-F3-A 6773.57,2486.72 r180 top locked
U16 "MICRF220AYQS" 16-QSOP 6905,4002 r180 top locked
U17 "AS312" AS312 6804.04,4490.01 r225 top locked
U18 "AP4008QD" PDFN3x3 2561.08,767.58 r270 top locked
U19 "BQ24650RVAR" QFN-16-EP(3.6x3.6) 2253.78,684.8 r0 top locked
U20 "MIC29302WU-TR" "TO-263-5 (D2PAK)" 3682.71,818.99 r90 top locked
U21 "SIM7500E" SIM7500E 1852.98,4383.52 r0 top locked
U22 "SMF05CT1G-ES" SOT-363 1420,4069 r270 top
U23 "TXB0102DCUT" VSSOP-8(2x2.3x0.5) 2898.11,4119.36 r270 top
U24 "SP3485EIM/TR" SOP-8 4673.02,3812.48 r180 top
X1 "8MHz" XC32M4-8.000-F18LJDT 3649.11,2638.36 r270 top
X2 "13.52313MHz" HC-49S-2P 6907,3769 r180 top locked
X3 "32.768kHz" X321532768KGD2SI 3671,2801.85 r270 top

## Footprints (in the part's own frame and the unit in brackets; to place one, negate y for a bottom-side part, rotate by r counter-clockwise, add the part's x,y. Pads: shape width x height; smd on the part's side, far side on the other; paste and mask are expansions set on the pad)
16-QSOP [mm]
  rect 1.45x0.35 smd: 1(-2.475,2.222) 2(-2.475,1.587) 3(-2.475,0.952) 4(-2.475,0.317) 5(-2.475,-0.318) 6(-2.475,-0.953) 7(-2.475,-1.588) 8(-2.475,-2.223) 9(2.475,-2.222) 10(2.475,-1.587) 11(2.475,-0.952) 12(2.475,-0.317) 13(2.475,0.318) 14(2.475,0.953) 15(2.475,1.588) 16(2.475,2.223)
  silkscreen extent -3.54,-2.51 1.35,2.51, body extent -3,-2.45 3,2.45, height 1.76
10118194-0001LF_ [mm]
  rect 0.42x1.35 smd: 1(-1.3,0) 2(-0.65,0) 3(0,0) 4(0.65,0) 5(1.3,0)
  oval 1.25x1 hole 0.55 slot 0.85 at 0 deg: MH1(-2.5,0) MH2(2.5,0)
  oval 0.8x1.55 hole 0.5 slot 1.15 at 90 deg: MH3(-3.5,-2.7) MH4(3.5,-2.7)
  rect 1.5x1.55 smd: MP1(-1,-2.7) MP2(1,-2.7)
  Top Layer region: 193 vertices and 0 holes, not listed, extent 2.3,-3.48 4,-1.925
  Top Layer region: 193 vertices and 0 holes, not listed, extent -4,-3.475 -2.3,-1.92
  silkscreen extent -3.73,-5 3.72,0.71, body extent -4.02,-5.34 4.03,0.19, height 2.69
20021121-00010C4LF_ [mm]
  rect 0.76x2.4 smd: 1(-2.54,-1.95) 2(-2.54,1.95) 3(-1.27,-1.95) 4(-1.27,1.95) 5(0,-1.95) 6(0,1.95) 7(1.27,-1.95) 8(1.27,1.95) 9(2.54,-1.95) 10(2.54,1.95)
  silkscreen extent -3.43,-2.08 3.23,1.22, body extent -3.17,-2.78 3.18,2.72, height 4.5
A2008WR-S-8P [mm]
  rect 1x3.4 smd: 1(-7.5,3.75) 2(-5.5,3.75) 3(-3.5,3.75) 4(-1.5,3.75) 5(0.5,3.75) 6(2.5,3.75) 7(4.5,3.75) 8(6.5,3.75)
  rect 1.5x3.6 smd: MP1(-9.8,-3.75) MP2(8.8,-3.75)
  silkscreen extent -10.54,-5.82 9.54,3.84, body extent -10.51,-5.77 9.49,4.23, height 5.2
ALS-PT19-315C/L177/TR [mm]
  rect 0.82x0.82 smd: 1(-0.75,0) 2(0.75,0)
  silkscreen extent -1.7,-0.53 1.27,0.53, body extent -0.85,-0.4 0.85,0.4, height 0.6
AS312 [mm]
  round 1.8 hole 0.9: 1(-2.54,1.27) 2(0,-1.27) 3(2.54,1.27)
  silkscreen extent -4.55,-3.28 4.55,5.82, body extent -4.58,-3.25 4.52,5.85, height 4.25
Cap0402 [mil]
  rect 18x25 smd mask+2.36: 1(-18.5,0) 2(18.5,0)
  silkscreen extent -31,-16 31,16, body extent -20,-10 20,10, height 19
Cap0603 [mil]
  rect 30x35 smd mask+2.36: 1(-30,0) 2(30,0)
  silkscreen extent -49,-21 49,21, body extent -32,-16 31,16, height 34
Cap-0402 [mil]
  rect 18x25 smd mask+2.36: 1(-18.5,0) 2(18.5,0)
  silkscreen extent -31,-16 31,16, body extent -20,-10 20,10, height 19
Cap-0603 [mil]
  rect 30x35 smd mask+2.36: 1(-30,0) 2(30,0)
  silkscreen extent -49,-21 49,21, body extent -32,-16 31,16, height 34
Cap-0805 [mil] "SMD 0805"
  rect 40x60 smd mask+2.76: 1(-40,0) 2(40,0)
  silkscreen extent -64,-34 64,34, body extent -39,-25 39,25, height 30
Cap-1206 [mil] "SMD 1206"
  rect 60x70 smd: 1(-50,0) 2(50,0)
  silkscreen extent -84,-39 84,39, body extent -63,-31 63,32, height 39
"CAP-CASE A" [mm]
  rect 1.06x1.19 smd: 1(-1.355,0) 1(-1.355,0) 2(1.355,0)
  silkscreen extent -1.98,-0.86 1.5,1.01, body extent -1.6,-0.8 1.6,0.8, height 1.8
Case-B [mm]
  rect 1.7x3 smd paste+0: 1(-1.7,0) 2(1.7,0)
  silkscreen extent -3.35,-1.63 2.03,1.63, body extent -1.85,-1.5 1.85,1.5, height 2.16
Case-E [mm]
  rect 2.79x2.57 smd: 1(0,0) 2(6.44,0)
  silkscreen extent -1.56,-2.31 7.03,2.31, body extent -0.27,-2.21 6.92,2.21, height 2.88
D2Pak. [mm]
  rect 2.08x3.81 smd: 1(-2.54,-5.335) 2(2.54,-5.335)
  rect 11.43x8.89 smd: 3(0,5.335)
  silkscreen extent -5.21,-5.46 5.11,0.51, body extent -5.08,-6.6 5.02,8.79, height 4.5
DFN1006-2L_ [mm]
  rect 0.55x0.66 smd: 1(-0.425,0) 2(0.425,0)
  silkscreen extent -1.14,-0.51 0.81,0.51, body extent -0.5,-0.3 0.5,0.3, height 0.47
DSN0603-2 [mm]
  rect 0.2x0.24 smd mask+0.055: 1(-0.2,0) 2(0.2,0)
  silkscreen extent -0.38,-0.2 0.38,0.2, body extent -0.3,-0.15 0.3,0.15, height 0.32
Fuse-0603 [mm]
  rect 1x1 smd: 1(-0.85,0) 2(0.85,0)
  silkscreen extent -0.25,-0.48 0.25,0.48, body extent -0.77,-0.42 0.78,0.43, height 0.45
Fuse-0805 [mm]
  rect 1x1.7 smd: 1(-1.1,0) 2(1.1,0)
  silkscreen extent -0.41,-0.81 0.41,0.81, body extent -1.1,-0.75 1.1,0.75, height 1.24
HC-49S-2P [mm]
  round 1.6 hole 0.9: 1(-2.44,0) 2(2.44,0)
  silkscreen extent -5.66,-2.41 5.66,2.41, body extent -5.7,-2.29 5.65,2.36, height 3.7
HDR1X2 [mm] "CONN HEADER VERT 2POS 2.54MM"
  rect 1.8x1.8 hole 0.9: 1(0,0)
  round 1.8 hole 0.9: 2(2.54,0)
  silkscreen extent -1.27,-1.27 3.81,1.27, body extent -1.27,-1.27 3.81,1.27, height 8.44
HDR1X3 [mm] "Connector; Header; 3 Position"
  rect 1.8x1.8 hole 0.9: 1(0,0)
  round 1.8 hole 0.9: 2(2.54,0) 3(5.08,0)
  silkscreen extent -1.27,-1.27 6.35,1.27, body extent -1.27,-1.24 6.35,1.25, height 8.54
HDR1X4 [mm] "Connector; Header; 4 Position"
  rect 1.8x1.8 hole 0.95: 1(0,0)
  round 1.8 hole 0.95: 2(2.54,0) 3(5.08,0) 4(7.62,0)
  silkscreen extent -1.27,-1.27 8.89,1.27, body extent -1.27,-1.27 8.89,1.27, height 9.5
"HDR1X4 Female" [mm]
  rect 1.6x1.6 hole 0.95: 1(-3.81,0)
  round 1.6 hole 0.95: 2(-1.27,0) 3(1.27,0) 4(3.81,0)
  silkscreen extent -5.49,-1.27 5.36,1.27, body extent -5.38,-1.3 5.28,1.24, height 8.5
HDR1X4_ [mm] "Connector; Header; 4 Position"
  rect 1.6x1.6 hole 0.95: 1(0,0)
  round 1.6 hole 0.95: 2(2.54,0) 3(5.08,0) 4(7.62,0)
  silkscreen extent -1.27,-1.27 8.89,1.27, body extent -1.27,-1.27 8.89,1.27, height 9.5
HDR1X6 [mm] "Connector; Header; 6 Position"
  rect 1.8x1.8 hole 0.9: 1(0,0)
  round 1.8 hole 0.9: 2(2.54,0) 3(5.08,0) 4(7.62,0) 5(10.16,0) 6(12.7,0)
  silkscreen extent -1.27,-1.27 13.97,1.27, body extent -1.27,-1.24 13.97,1.25, height 8.54
HDR1X7 [mm] "Connector; Header; 7 Position"
  rect 1.6x1.6 hole 0.9: 1(0,0)
  round 1.6 hole 0.9: 2(2.54,0) 3(5.08,0) 4(7.62,0) 5(10.16,0) 6(12.7,0) 7(15.24,0)
  silkscreen extent -1.27,-1.27 16.51,1.27, body extent -1.27,-1.24 16.51,1.25, height 8.74
HJ-SMA508 [mm]
  round 2.5 hole 1.4: 1(0,0)
  round 2.5 hole 1.5: 2(-2.54,2.54) 3(-2.54,-2.54) 4(2.54,-2.54) 5(2.54,2.54)
  silkscreen extent -3.05,-3.05 3.05,3.05, body extent -3,-2.95 3,11.05, height 9.6
Ind0805 [mm] "Inductor 0805"
  rect 1.2x1.32 smd: 1(-1,0) 2(1,0)
  silkscreen extent -1.72,-0.79 1.73,0.79, body extent -1,-0.62 1,0.63, height 0.47
"IND 0402" [mm]
  rect 0.4x0.6 smd: 1(-0.35,0) 2(0.35,0)
  silkscreen extent -0.71,-0.46 0.71,0.46, body extent -0.5,-0.25 0.5,0.25, height 0.25
"IND 0603" [mm]
  rect 0.9x0.97 smd: 1(-0.785,0) 2(0.785,0)
  silkscreen extent -1.4,-0.64 1.4,0.64, body extent -0.8,-0.4 0.8,0.4, height 0.78
"LED 0402" [mm]
  rect 0.62x0.72 smd: 1(-0.475,0) 2(0.475,0)
  silkscreen extent -0.91,-0.56 1.6,0.56, body extent -0.5,-0.25 0.51,0.25, height 0.45
LED-0402 [mm]
  rect 0.62x0.72 smd: 1(-0.475,0) 2(0.475,0)
  silkscreen extent -0.89,-0.51 1.55,0.51, body extent -0.5,-0.25 0.51,0.25, height 0.45
LED-0603 [mm]
  rect 0.5x1 smd: 1(-0.75,0) 2(0.75,0)
  silkscreen extent -1.12,-0.66 1.75,0.66, body extent -0.82,-0.37 0.82,0.36, height 0.68
LQFP-100 [mm]
  rect 1.2x0.3 smd: 1(-7.75,6) 2(-7.75,5.5) 3(-7.75,5) 4(-7.75,4.5) 5(-7.75,4) 6(-7.75,3.5) 7(-7.75,3) 8(-7.75,2.5) 9(-7.75,2) 10(-7.75,1.5) 11(-7.75,1) 12(-7.75,0.5) 13(-7.75,0) 14(-7.75,-0.5) 15(-7.75,-1) 16(-7.75,-1.5) 17(-7.75,-2) 18(-7.75,-2.5) 19(-7.75,-3) 20(-7.75,-3.5) 21(-7.75,-4) 22(-7.75,-4.5) 23(-7.75,-5) 24(-7.75,-5.5) 25(-7.75,-6) 51(7.75,-6) 52(7.75,-5.5) 53(7.75,-5) 54(7.75,-4.5) 55(7.75,-4) 56(7.75,-3.5) 57(7.75,-3) 58(7.75,-2.5) 59(7.75,-2) 60(7.75,-1.5) 61(7.75,-1) 62(7.75,-0.5) 63(7.75,0) 64(7.75,0.5) 65(7.75,1) 66(7.75,1.5) 67(7.75,2) 68(7.75,2.5) 69(7.75,3) 70(7.75,3.5) 71(7.75,4) 72(7.75,4.5) 73(7.75,5) 74(7.75,5.5) 75(7.75,6)
  rect 0.3x1.2 smd: 26(-6,-7.75) 27(-5.5,-7.75) 28(-5,-7.75) 29(-4.5,-7.75) 30(-4,-7.75) 31(-3.5,-7.75) 32(-3,-7.75) 33(-2.5,-7.75) 34(-2,-7.75) 35(-1.5,-7.75) 36(-1,-7.75) 37(-0.5,-7.75) 38(0,-7.75) 39(0.5,-7.75) 40(1,-7.75) 41(1.5,-7.75) 42(2,-7.75) 43(2.5,-7.75) 44(3,-7.75) 45(3.5,-7.75) 46(4,-7.75) 47(4.5,-7.75) 48(5,-7.75) 49(5.5,-7.75) 50(6,-7.75) 76(6,7.75) 77(5.5,7.75) 78(5,7.75) 79(4.5,7.75) 80(4,7.75) 81(3.5,7.75) 82(3,7.75) 83(2.5,7.75) 84(2,7.75) 85(1.5,7.75) 86(1,7.75) 87(0.5,7.75) 88(0,7.75) 89(-0.5,7.75) 90(-1,7.75) 91(-1.5,7.75) 92(-2,7.75) 93(-2.5,7.75) 94(-3,7.75) 95(-3.5,7.75) 96(-4,7.75) 97(-4.5,7.75) 98(-5,7.75) 99(-5.5,7.75) 100(-6,7.75)
  silkscreen extent -8.13,-7.27 7.24,7.24, body extent -8,-8 8,8, height 1.6
LTC4359CMS8#PBF [mm]
  rect 0.889x0.42 smd: 1(-2.105,0.975) 2(-2.105,0.325) 3(-2.105,-0.325) 4(-2.105,-0.975) 5(2.105,-0.975) 6(2.105,-0.325) 7(2.105,0.325) 8(2.105,0.975)
  silkscreen extent -2.51,-1.57 1.42,1.57, body extent -2.46,-1.53 2.46,1.52, height 1.01
PDFN3x3 [mm]
  rect 0.6x0.4 smd: 1(-1.5,0.975) 2(-1.5,0.325) 3(-1.5,-0.325) 4(-1.5,-0.975) 5(1.5,-0.325) 5(1.5,-0.975) 6(1.5,0.975) 6(1.5,0.325)
  rect 2.35x1.27 smd: 5(0.356,-0.762)
  rect 2.35x1.29 smd: 6(0.356,0.762)
  silkscreen extent -1.99,-1.68 1.55,1.68, body extent -1.68,-1.64 1.68,1.64, height 0.77
"Pogo 4 Pin" [mm]
  round 1.6 smd: 1(-3.75,0) 2(-1.25,0) 3(1.25,0) 4(3.75,0)
  silkscreen extent -5.11,-1.09 4.83,1.09
"PowerDI™ 5" [mm]
  rect 1.39x1.4 smd: 1(-0.92,-1.991) 2(0.92,-1.991)
  rect 3.36x4.86 smd: 3(0,1.991)
  silkscreen extent -2.16,-2.24 2.03,3.51, body extent -1.98,-2.39 1.98,4.12, height 1.15
PS2801C-1-F3-A [mm]
  rect 1.3x0.9 smd: 1(-3.15,0.635) 2(-3.15,-0.635) 3(3.15,-0.635) 4(3.15,0.635)
  silkscreen extent -3.77,-1.45 2,1.45, body extent -3.5,-1.4 3.5,1.4, height 2.1
QFN-16-EP(3.6x3.6) [mm]
  rect 0.82x0.28 smd: 1(-1.75,0.75) 2(-1.75,0.25) 3(-1.75,-0.25) 4(-1.75,-0.75) 9(1.75,-0.75) 10(1.75,-0.25) 11(1.75,0.25) 12(1.75,0.75)
  rect 0.28x0.82 smd: 5(-0.75,-1.75) 6(-0.25,-1.75) 7(0.25,-1.75) 8(0.75,-1.75) 13(0.75,1.75) 14(0.25,1.75) 15(-0.25,1.75) 16(-0.75,1.75)
  round 0.5 hole 0.3: 17(-0.5,-0.5) 17(-0.5,0.5) 17(0.5,-0.5) 17(0.5,0.5)
  rect 2.14x2.14 smd: 17(0,0)
  silkscreen extent -2.4,-1.8 1.78,1.8, body extent -1.75,-1.75 1.75,1.75, height 1
"RES 0805" [mil] "SMD 0805"
  rect 40x50 smd: 1(-40,0) 2(40,0)
  silkscreen extent -64,-29 64,29, body extent -39,-25 39,24, height 24
"RES 2512" [mm] "0.033O ±1% 2W ±1800ppm/°C 2512 Low Resistors & Current Sense Resistors - Surface Mount RoHS"
  rect 1.6x3.4 smd: 1(-3.25,0) 2(3.25,0)
  silkscreen extent -4.24,-1.85 4.24,1.85, body extent -3.17,-1.63 3.18,1.63, height 0.58
Res-0201 [mm]
  rect 0.27x0.37 smd mask+0.055: 1(-0.275,0) 2(0.275,0)
  silkscreen extent -0.48,-0.25 0.48,0.25, body extent -0.3,-0.15 0.3,0.15, height 0.29
Res-0402 [mil]
  rect 18x25 smd mask+2.17: 1(-18.5,0) 2(18.5,0)
  silkscreen extent -32,-17 32,16, body extent -23,-11 23,11, height 16
RES-0603 [mil]
  rect 30x35 smd: 1(-30,0) 2(30,0)
  silkscreen extent -49,-21 49,21, body extent -31,-17 31,17, height 18
Res-0603 [mil]
  rect 30x35 smd: 1(-30,0) 2(30,0)
  silkscreen extent -48,-21 48,21, body extent -31,-17 31,17, height 18
RES-0805 [mil] "SMD 0805"
  rect 40x50 smd: 1(-40,0) 2(40,0)
  silkscreen extent -64,-29 64,29, body extent -39,-25 39,24, height 24
Res-1206 [mil]
  rect 60x70 smd: 1(-50,0) 2(50,0)
  silkscreen extent -84,-39 84,39, body extent -63,-31 63,32, height 39
RES-2512 [mm]
  rect 1.6x3.4 smd: 1(-3.25,0) 2(3.25,0)
  silkscreen extent -4.24,-1.85 4.24,1.85, body extent -3.17,-1.63 3.18,1.63, height 0.58
RU6085H [mm]
  rect 1.4x0.57 smd: 1(-2.75,1.905) 2(-2.75,0.635) 3(-2.75,-0.635) 4(-2.75,-1.905) 5(2.75,-1.905) 6(2.75,-0.635) 7(2.75,0.635) 8(2.75,1.905)
  silkscreen extent -2.88,-2.57 1.85,2.72, body extent -3.1,-2.5 3.1,2.5, height 1.5
RVT1E100M0405. [mm] "10uF 25V 5.4mm SMD"
  rect 2.6x1.6 smd: 1(-1.8,0) 2(1.8,0)
  silkscreen extent -3.1,-2.21 2.16,2.21, body extent -2.65,-2.15 2.65,2.15, height 3.95
SIM7500E [mm]
  rect 1.3x0.9 smd: 1(0,0) 2(0,-1.5) 3(0,-3) 4(0,-4.5) 5(0,-6) 6(0,-7.5) 7(0,-9) 8(0,-10.5) 9(0,-12) 10(0,-13.5) 11(0,-15) 12(0,-16.5) 13(0,-18) 14(0,-19.5) 15(0,-21) 29(22.4,-21) 30(22.4,-19.5) 31(22.4,-18) 32(22.4,-16.5) 33(22.4,-15) 34(22.4,-13.5) 35(22.4,-12) 36(22.4,-10.5) 37(22.4,-9) 38(22.4,-7.5) 39(22.4,-6) 40(22.4,-4.5) 41(22.4,-3) 42(22.4,-1.5) 43(22.4,0)
  rect 0.9x1.3 smd: 16(2.2,-23.2) 17(3.7,-23.2) 18(5.2,-23.2) 19(6.7,-23.2) 20(8.2,-23.2) 21(9.7,-23.2) 22(11.2,-23.2) 23(12.7,-23.2) 24(14.2,-23.2) 25(15.7,-23.2) 26(17.2,-23.2) 27(18.7,-23.2) 28(20.2,-23.2) 44(20.2,2.2) 45(18.7,2.2) 46(17.2,2.2) 47(15.7,2.2) 48(14.2,2.2) 49(12.7,2.2) 50(11.2,2.2) 51(9.7,2.2) 52(8.2,2.2) 53(6.7,2.2) 54(5.2,2.2) 55(3.7,2.2) 56(2.2,2.2)
  Keep-Out Layer region: 1.05,-0.96 3.15,-0.96 3.15,1.14 1.05,1.14
  silkscreen extent -1.66,-24.04 23.25,3.06, body extent -0.81,-23.99 23.19,3.01, height 2.82
SLF12575T-221M1R3-PF [mm]
  rect 2.6x3.2 smd: 1(-5.55,0) 2(5.55,0)
  silkscreen extent -7.48,-6.32 6.35,6.32, body extent -6.27,-6.33 6.33,6.27, height 7.5
SMA#1 [mm]
  rect 2x2 smd: 1(-2,0) 2(2,0)
  silkscreen extent -4.24,-1.55 2.08,1.55, body extent -2.6,-1.3 2.6,1.3, height 2.4
SMA#2 [mm]
  rect 2.5x1.7 smd: 1(-2,0) 2(2,0)
  silkscreen extent -4.45,-1.42 2.06,1.42, body extent -2.6,-1.3 2.6,1.3, height 2.4
SMAJ5.0CA [mm]
  rect 2x2 smd: 1(-2,0) 2(2,0)
  silkscreen extent -3.1,-1.52 2.06,1.52, body extent -2.6,-1.3 2.6,1.3, height 2.4
SMB [mm]
  rect 2.5x2.3 smd: 1(-2.15,0) 2(2.15,0)
  silkscreen extent -4.42,-1.91 2.27,1.9, body extent -2.7,-1.8 2.7,1.8, height 2.3
SMB_ [mm]
  rect 2.8x2.4 smd: 1(-2.3,0) 2(2.3,0)
  silkscreen extent -2.21,-1.9 4.83,1.91, body extent -2.7,-1.8 2.7,1.8, height 2.3
SOD-123 [mm]
  rect 0.95x0.9 smd: 1(-1.575,0) 2(1.575,0)
  silkscreen extent -1.37,-0.8 2.82,0.8, body extent -1.82,-0.77 1.83,0.78, height 1.5
SOD-523 [mm] "SOD-523 Schottky Barrier Diodes (SBD) ROHS"
  rect 0.6x0.7 smd: 1(-0.6,0) 2(0.6,0)
  silkscreen extent -0.61,-0.53 1.42,0.53, body extent -0.8,-0.4 0.8,0.4, height 0.7
SOIC-8 [mm]
  rect 1.6x0.65 smd: 1(-2.667,1.905) 2(-2.667,0.635) 3(-2.667,-0.635) 4(-2.667,-1.905) 5(2.733,-1.905) 6(2.733,-0.635) 7(2.733,0.635) 8(2.733,1.905)
  silkscreen extent -3.34,-2.54 1.99,2.68, body extent -3,-2.46 3,2.46, height 1.61
"Solder Bridge" [mil] "Solder Bridge ON"
  rect 30x35 smd: 1(-30,0) 2(30,0)
  silkscreen extent -50,-22 50,22
SOP-8 [mm]
  rect 1.3x0.7 smd: 1(-2.75,1.905) 2(-2.75,0.635) 3(-2.75,-0.635) 4(-2.75,-1.905) 5(2.75,-1.905) 6(2.75,-0.635) 7(2.75,0.635) 8(2.75,1.905)
  silkscreen extent -3.69,-2.57 2.03,2.57, body extent -3.1,-2.5 3.1,2.5, height 1.76
SOT23-3 [mm] "SOT23, 3-Leads, Body 2.9x1.3mm, Pitch 0.95mm, Lead Span 2.3mm - Reverse Pinning, IPC High Density"
  rect 0.8x0.8 smd: 1(-0.95,-1.075) 2(0.95,-1.075) 3(0,1.075)
  silkscreen extent -1.73,-1.19 1.55,0.74, body extent -1.5,-1.25 1.5,1.25, height 1.05
Sot-23 [mm] "TRANS NPN 40V 0.6A SOT23"
  rect 0.82x0.92 smd: 1(-0.95,-1) 2(0.95,-1) 3(0,1)
  silkscreen extent -1.68,-1.3 1.55,0.81, body extent -1.5,-1.25 1.5,1.25, height 1.05
sot-23 [mm] "TRANS NPN 40V 0.6A SOT23"
  rect 0.82x0.92 smd: 1(-0.95,-1) 2(0.95,-1) 3(0,1)
  silkscreen extent -1.68,-1.3 1.55,0.81, body extent -1.5,-1.25 1.5,1.25, height 1.05
SOT-23 [mm] "TRANS NPN 40V 0.6A SOT23"
  rect 0.82x0.92 smd: 1(-0.95,-1) 2(0.95,-1) 3(0,1)
  silkscreen extent -1.82,-1.23 1.55,0.74, body extent -1.5,-1.25 1.5,1.25, height 1.1
SOT-23-5 [mm]
  rect 1.1x0.6 smd: 1(-1.3,0.95) 2(-1.3,0) 3(-1.3,-0.95) 4(1.3,-0.95) 5(1.3,0.95)
  silkscreen extent -1.74,-1.5 0.88,1.65, body extent -1.4,-1.45 1.4,1.45, height 1.45
SOT-23-6 [mm] "IC BAT CHG LI-ION 1 CELL SOT23-6"
  rect 1.12x0.62 smd: 1(-1.3,0.95) 2(-1.3,0) 3(-1.3,-0.95) 4(1.3,-0.95) 5(1.3,0) 6(1.3,0.95)
  silkscreen extent -1.57,-1.5 0.86,1.7, body extent -1.4,-1.45 1.4,1.45, height 1.44
SOT-223 [mm]
  rect 0.95x2.15 smd: 1(-2.3,-2.9) 2(0,-2.9) 3(2.3,-2.9)
  rect 3.25x2.15 smd: 4(0,2.9)
  silkscreen extent -3.6,-3.07 3.3,1.75, body extent -3.28,-3.51 3.22,3.45, height 1.65
SOT-363 [mm]
  rect 0.8x0.4 smd: 1(-0.97,0.65) 2(-0.97,0) 3(-0.97,-0.65) 4(0.97,-0.65) 5(0.97,0) 6(0.97,0.65)
  silkscreen extent -1.65,-1.09 0.51,1.09, body extent -1.15,-1.05 1.15,1.05, height 1
SS510B [mm]
  rect 2.4x2.8 smd: 1(-2.3,0) 2(2.3,0)
  silkscreen extent -4.57,-1.91 2.03,1.9, body extent -2.7,-1.8 2.7,1.8, height 2.3
SS-12D02-G040 [mm]
  rect 1.7x1.7 hole 1: 1(-2,0)
  round 1.7 hole 1: 2(0,0) 3(2,0)
  rect 1.5x2.2 hole 0.7 square: MH1(-4.1,0) MH2(4.1,0)
  silkscreen extent -4.32,-2.31 4.32,2.31, body extent -4.32,-2.25 4.28,2.25, height 9.47
TBP01R1-508-02BE [mm]
  rect 3x3 hole 1.7: 1(-2.54,0)
  round 3 hole 1.7: 2(2.54,0)
  silkscreen extent -5.88,-2 5.88,10, body extent -5.83,-1.98 5.93,10.02, height 8.5
TBP01R1-508-03BE [mm]
  rect 3x3 hole 1.7: 1(-2.54,0)
  round 3 hole 1.7: 2(2.54,0) 3(7.62,0)
  silkscreen extent -5.88,-2 10.96,10, body extent -5.88,-2.04 10.96,9.96, height 8.5
TBP01R1-508-04BE [mm]
  rect 3x3 hole 1.7: 1(-5.08,0)
  round 3 hole 1.7: 2(0,0) 3(5.08,0) 4(10.16,0)
  silkscreen extent -8.42,-2 13.5,10, body extent -8.46,-1.99 13.46,10.01, height 8.5
"TEST POINT"#1 [mil]
  oct 60x60 smd: 1(0,119.87)
  silkscreen extent -37,-37 37,37
"TEST POINT"#2 [mil]
  oct 60x60 smd: 1(0,0)
  silkscreen extent -37,-37 37,37
"TEST POINT"#3 [mil]
  oct 60x60 smd: 1(0,-119.87)
  silkscreen extent -37,-37 37,37
TL3300CF160Q [mm] "SWITCH TACTILE SPST-NO 0.05A 12V"
  rect 2.5x1.8 smd: 1(-7.75,2.5) 2(7.75,2.5) 3(-7.75,-2.5) 4(7.75,-2.5)
  silkscreen extent -9,-6.12 6.15,6.12, body extent -7.5,-5.98 7.5,6.02, height 8.77
"TO-263-5 (D2PAK)" [mm]
  rect 1.02x4.32 smd: 1(-3.4,-4.573) 2(-1.7,-4.573) 3(0,-4.573) 4(1.7,-4.573) 5(3.4,-4.573)
  rect 11.18x9.91 smd: 6(0,4.573)
  silkscreen extent -5.16,-4.72 5.16,-0.61, body extent -5.11,-5.78 5.05,9.13, height 4.83
U.FL-R-SMT-1(80)_ [mm]
  rect 1.02x1.07 smd: 1(0,-0.974)
  rect 1.07x2.2 smd: 2(1.475,0.974) 3(-1.475,0.974)
  silkscreen extent -1.22,-1.09 1.22,2.21, body extent -1.47,-0.74 1.53,2.36, height 1.2
UWX1E101MCL1GB [mm]
  rect 5.3x3.3 smd: 1(-3.65,0) 2(3.65,0)
  silkscreen extent -5.59,-4.32 4.27,4.32, body extent -4.65,-4.25 4.65,4.25, height 10.34
VSSOP-8(2x2.3x0.5) [mm]
  rect 0.8x0.3 smd: 1(-1.55,0.75) 2(-1.55,0.25) 3(-1.55,-0.25) 4(-1.55,-0.75) 5(1.55,-0.75) 6(1.55,-0.25) 7(1.55,0.25) 8(1.55,0.75)
  silkscreen extent -2.24,-1.04 1.07,1.04, body extent -1.55,-1 1.55,1, height 0.88
VT1H471MI135000CE0 [mm] "470uF ±20% 50V 12.5mm 13.5mm 1000hrs 105? -40?~+105? SMD,12.5x13.5mm Aluminum Electrolytic Capacitors - SMD RoHS"
  rect 6.2x1.75 smd: 1(-5.145,0) 2(5.145,0)
  silkscreen extent -8.62,-6.81 6.83,6.86, body extent -7.5,-6.85 7.5,6.85, height 14
X321532768KGD2SI [mm]
  rect 1x1.8 smd: 1(-1.25,0) 2(1.25,0)
  silkscreen extent -0.58,-0.81 0.58,0.81, body extent -1.6,-0.75 1.6,0.75, height 0.9
XC32M4-8.000-F18LJDT [mm]
  rect 1.3x1.2 smd: 1(-1.1,-0.85) 2(1.1,-0.85) 3(1.1,0.85) 4(-1.1,0.85)
  silkscreen extent -1.68,-1.85 1.65,1.3, body extent -1.6,-1.25 1.6,1.25, height 0.8
XKNANO-113 [mm]
  rect 0.7x2.1 smd: 1(-6.5,5.26) 2(6.5,5.26) 3(6.5,-6.74) 4(-6.5,-6.74)
  rect 0.8x1.14 smd: C1(0.25,6.74) C2(-2.29,6.74) C3(-4.83,6.74) C6(-1.02,6.74) C7(-3.56,6.74)
  rect 0.762x1.14 smd: C5(1.52,6.74) CD(2.47,6.74)
  rect 0x0 hole 0.75 unplated: MH(-5,-5.49) MH(3.5,-5.49)
  Keep-Out Layer region: 0.714,1.591 2.085,1.591 2.085,4.919 0.714,4.919
  Keep-Out Layer region: -1.826,1.591 -0.455,1.591 -0.455,4.919 -1.826,4.919
  Keep-Out Layer region: -4.366,1.591 -2.995,1.591 -2.995,4.919 -4.366,4.919
  Keep-Out Layer region: 0.714,-6.029 2.085,-6.029 2.085,-2.701 0.714,-2.701
  Keep-Out Layer region: -1.826,-6.029 -0.455,-6.029 -0.455,-2.701 -1.826,-2.701
  Keep-Out Layer region: -4.366,-6.029 -2.995,-6.029 -2.995,-2.701 -4.366,-2.701
  silkscreen extent -6.6,-7.95 6.58,7.06, body extent -6.55,-7.57 6.54,7.01, height 1.37
YS-SBZ9032C03R16 [mm] "NO 2700Hz 85dB @ 3V, 10cm 3V F9mm SMD,9x3.2mm Buzzers RoHS"
  rect 3x1.8 smd: 1(-4,0) 2(4,0)
  silkscreen extent -5.46,-4.5 6.06,6.54, body extent -5.25,-4.5 5.25,6.5, height 3.3
YSPI1040-3R3M [mm]
  rect 4.1x4.1 smd: 1(-4.75,0) 2(4.75,0)
  silkscreen extent -5.27,-5 5.27,5, body extent -5.5,-5 5.5,5, height 4